# Altium PCB board_orig.PcbDoc
Units mm, origin at the board's own origin, x right, y up, seen from the top; angles counter-clockwise.
Board outline 22 x 15 mm, 2 copper layers (Top Layer, Bottom Layer), stack 0.97 mm thick; 27 components, 19 nets, 66 pads, 0 vias.
Unrouted connection lines stored in the file: 1.
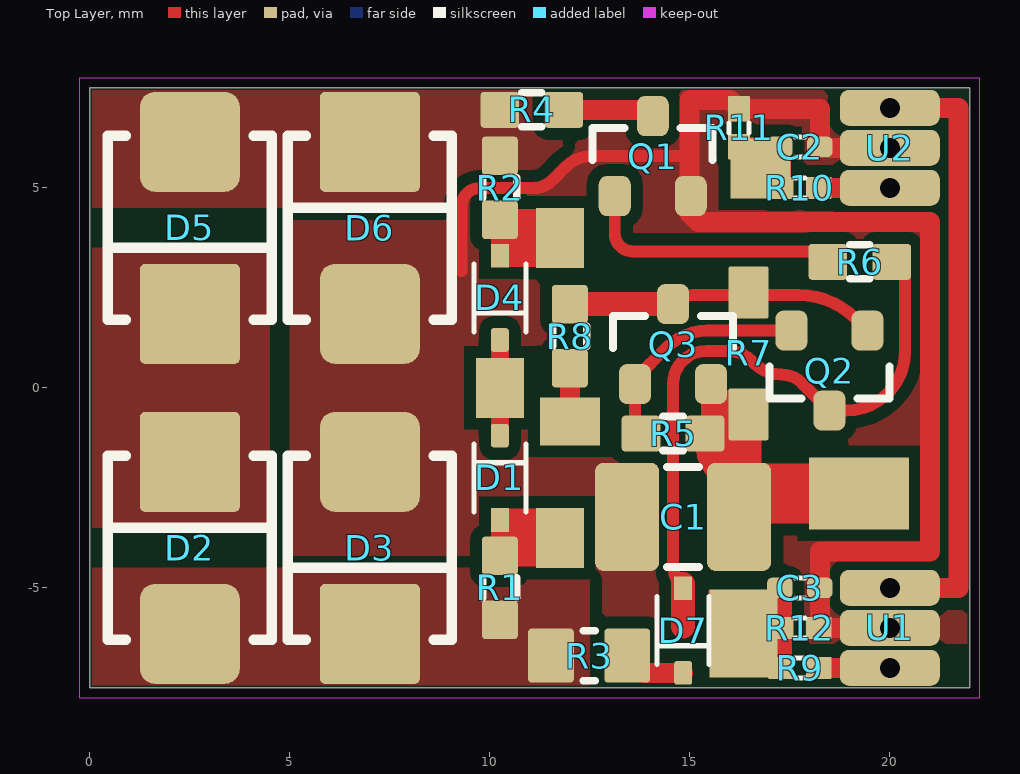
[diagram p0: Top Layer view]
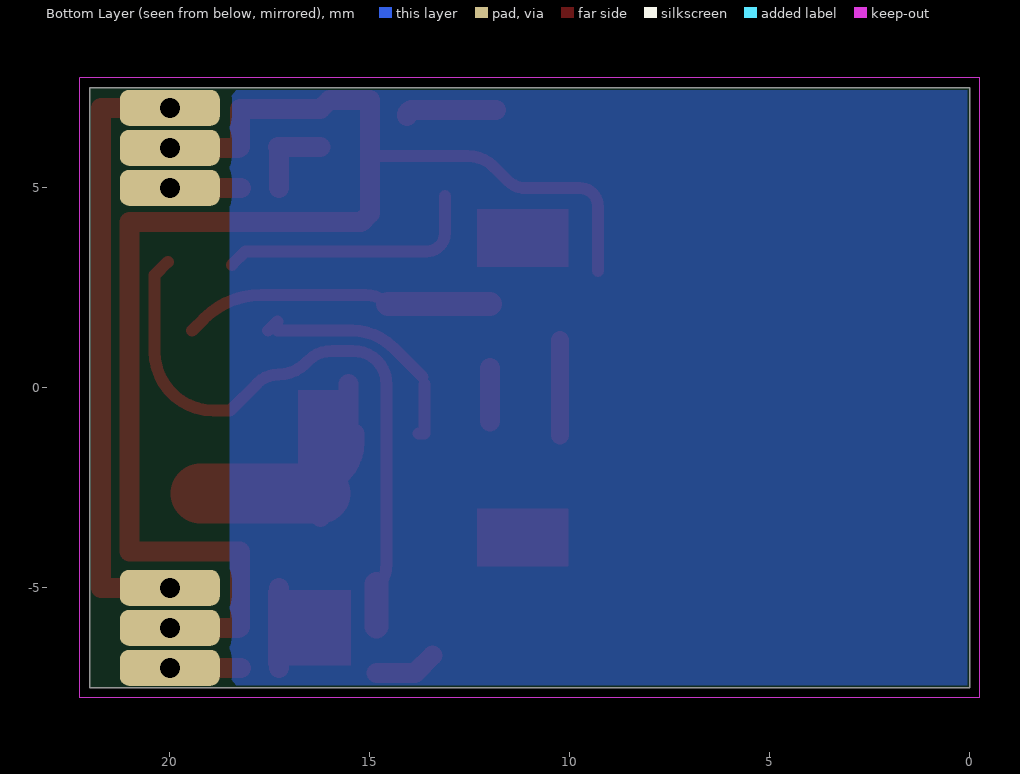
[diagram p1: Bottom Layer view, seen from below]
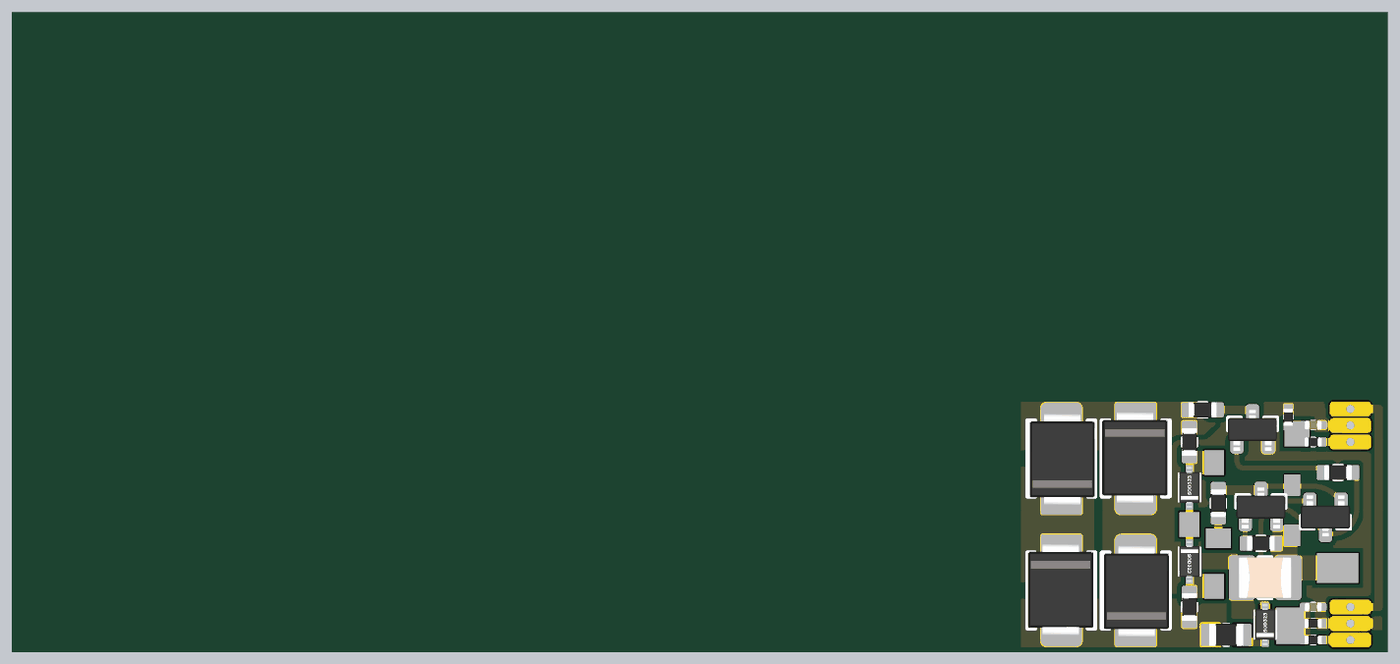
[diagram p2: 3D render of the assembled board from above, using the file's embedded part models]

## Layer stack, top to bottom
Top Solder: solder mask 0.0127, Solder Resist, Dk 3.8
Top Layer: signal copper 0.035
Dielectric: core 0.9, FR-4, Dk 4.5
Bottom Layer: signal copper 0.035
Bottom Solder: solder mask 0.0127, Solder Resist, Dk 3.8

## Board outline
0,-7.5 22,-7.5 22,7.5 0,7.5

## Design rules (kind name [scope] priority, off if disabled: settings)
AcuteAngle [All] p1: minimum=6.00000000000000E+0001 checktracksonly=FALSE
BoardOutlineClearance [All] p1: gap=0 ignorepadtopadclearanceinfootprint=FALSE
Clearance Clearance_1 [All] p1: gap=0.3 ignorepadtopadclearanceinfootprint=FALSE except(0.1: Arc-THPad Track-THPad SMDPad-THPad THPad-THPad; 0.13: Arc-Arc Arc-Track Arc-SMDPad Arc-Via Track-Track Track-SMDPad Track-Via SMDPad-SMDPad SMDPad-Via THPad-Via Via-Via; 0.15: Arc-Text Arc-Hole Track-Text Track-Hole SMDPad-Text SMDPad-Hole THPad-Text THPad-Hole Via-Text Via-Hole Fill-Text Fill-Hole Poly-Text Poly-Hole Region-Text Region-Hole Text-Text Text-Hole)
ComponentClearance ComponentClearance_1 [IsFree] p1: gap=-1 collisioncheckmode=3 verticalgap=2540 showdistances=FALSE
ComponentClearance [All] p2: gap=0.3 collisioncheckmode=3 verticalgap=0.254 showdistances=FALSE donotcheckwithout3dbody=TRUE
Height [All] p1: minheight=0 maxheight=500 prefheight=12.7
HoleSize [All] p1: absolutevalues=TRUE maxlimit=6 minlimit=0.2 maxpercent=80.000 minpercent=20.000
HoleToHoleClearance HoleToHoleClearance_1 [IsVia vs IsThruPin] p1: gap=0.7 allowstackedmicrovias=TRUE
HoleToHoleClearance [All] p2: gap=0.5 allowstackedmicrovias=TRUE
MinimumSolderMaskSliver [All] p1 off: minsoldermaskwidth=0.254
PlaneClearance [All] p1: clearance=0.45
PlaneConnect [All] p1: planeconnectstyle=Direct reliefexpansion=0.3 reliefentries=4 reliefconductorwidth=0.381 reliefairgap=0.178
PolygonConnect [All] p1: connectstyle=Direct reliefconductorwidth=0.381 reliefentries=4 polygonreliefangle="90 Angle" airgapwidth=0.356
RoutingVias [All] p1: holewidth=0.3 width=0.6 viastyle="Through Hole" minholewidth=0.2 minwidth=0.45 maxholewidth=0.9 maxwidth=1.27
SilkToSilkClearance [All] p1 off: silktosilkclearance=0.254
SilkToSolderMaskClearance [IsPad] p1 off: minsilkscreentomaskgap=0.254 clearancetoexposedcopper=TRUE
SolderMaskExpansion [All] p1: expansion=0.102 istentingtop=FALSE
SupplyNets "Schematic Supply Nets_7" [InNet('L1')] p1: voltage=0.000
SupplyNets "Schematic Supply Nets_6" [InNet('L2')] p2: voltage=0.000
SupplyNets "Schematic Supply Nets_5" [InNet('3V3')] p3: voltage=0.000
SupplyNets "Schematic Supply Nets_3" [InNet('Vb')] p4: voltage=0.000
SupplyNets "Schematic Supply Nets" [InNet('5V')] p5: voltage=0.000
SupplyNets "Schematic Supply Nets_1" [InNet('GND')] p6: voltage=0.000
UnRoutedNet [All] p1: checkbadconnections=TRUE
Width [All] p1: maxlimit=3.81 minlimit=0.14 preferedwidth=0.254
20 further rules are at their usual default settings.

## Components (designator, comment, footprint, x,y, rotation, side; value= is the part's Value field where it differs from the comment)
C1 "10u" C1210-2.5MM 14.834,-3.226 r180 top
C2 "100pF" C0402 17.75,6.024 r0 top
C3 "100pF" C0402 17.75,-5 r0 top
D1 "1N4148WS" SOD-323 10.25,-2.25 r270 top
D2 "ES2B" SMB 2.5,-4 r90 top
D3 "ES2B" SMB 7,-4 r270 top
D4 "1N4148WS" SOD-323 10.25,2.25 r90 top
D5 "ES2B" SMB 2.5,4 r270 top
D6 "ES2B" SMB 7,4 r90 top
D7 "BAS321" SOD-323 14.834,-6.071 r90 top
Q1 "MMBT2222" SOT-23 14.073,5.793 r270 top
Q2 "Bipolar PNP 3 Pins Transistor Gummel-Poon Model" SOT-23 18.491,0.432 r90 top
Q3 "Bipolar PNP 3 Pins Transistor Gummel-Poon Model" SOT-23 14.58,1.092 r270 top
R1 "20k" R0603 10.25,-5 r270 top
R2 "20k" R0603 10.25,5 r90 top
R3 "22" R0805 12.481,-6.694 r0 top
R4 "1" R0603 11.05,6.95 r0 top
R5 "33" R0603 14.58,-1.143 r180 top
R6 "4k7" R0603 19.25,3.15 r180 top
R7 "10k" R1206 16.468,0.86 r270 top
R8 "4k7" R0603 12,1.292 r270 top
R9 "1k" R0402 17.75,-7 r180 top
R10 "1k" R0402 17.75,5 r180 top
R11 "2k" R0402 16.23,6.5 r270 top
R12 "2k" R0402 17.75,-6 r180 top
U1 "SS49E" SS49E 20,-6 r0 top
U2 "SS49E" SS49E 20,6 r0 top

## Footprints (in the part's own frame and the unit in brackets; to place one, negate y for a bottom-side part, rotate by r counter-clockwise, add the part's x,y. Pads: shape width x height; smd on the part's side, far side on the other; paste and mask are expansions set on the pad)
C0402 [mm] "Chip Capacitor Body"
  rrect50% 0.635x0.508 smd mask+0.05: 1(-0.5,0) 2(0.5,0)
  silkscreen extent -0.13,-0.25 0.13,0.25, body extent -0.52,-0.27 0.53,0.28, height 0.55
C1210-2.5MM [mm] "Chip Capacitor"
  rrect25% 1.6x2.7 smd mask+0.05: 1(-1.4,0) 2(1.4,0)
  silkscreen extent -0.4,-1.25 0.4,1.25, body extent -1.6,-1.25 1.6,1.25, height 2.52
R0402 [mm]
  rrect10% 0.635x0.55 smd mask+0.05: 1(-0.476,0) 2(0.476,0)
  silkscreen extent -0.12,-0.25 0.13,0.25, body extent -0.52,-0.27 0.53,0.28, height 0.4
R0603 [mil] "Chip Resistor; Body 1.6 x 0.8 mm (LxW typ)"
  rrect20% 38x35.43 smd mask+1.97: 1(-31.5,0) 2(31.5,0)
  silkscreen extent -10,-17 10,17, body extent -33,-18 33,18, height 22
R0805 [mil] "Chip Resistor; Body 1.6 x 0.8 mm (LxW typ)"
  rrect15% 45x53.15 smd: 1(-37.5,0) 2(37.5,0)
  silkscreen extent -6,-25 6,25, body extent -41,-27 41,27, height 24
R1206 [mm] "Chip Resistor"
  rrect10% 1.3x1 smd mask+0.05: 1(-1.524,0) 2(1.524,0)
SMB [mm]
  rrect30% 2.5x2.5 smd mask+0.05: 1(-2.15,0)
  rrect10% 2.5x2.5 smd mask+0.05: 2(2.15,0)
  silkscreen extent -2.3,-2.05 2.3,2.05, body extent -2.75,-1.93 2.85,2.02, height 2.65
SOD-323 [mm]
  rect 0.59x0.45 smd mask+0.05: 1(1.055,0)
  rrect30% 0.59x0.45 smd mask+0.05: 2(-1.055,0)
  silkscreen extent -0.85,-0.65 0.85,0.65, body extent -1.25,-0.63 1.25,0.62, height 0.99
SOT-23 [mm]
  rrect50% 1x0.8 smd mask+0.05: 1(1,-0.95) 2(1,0.95) 3(-1,0)
  silkscreen extent -0.7,-1.5 0.1,1.5, body extent -1.27,-1.5 1.33,1.5, height 1.1
SS49E [mm]
  rrect50% 2.5x0.9 hole 0.5: 1(0,1) 2(0,0) 3(0,-1)

## Part data
C1 C2 C3: library part CAP
D1 D2 D3 D4 D5 D6 D7: library part NCP51460SN33T1G
Q1: library part MMBT2222ALT1G
Q2 Q3: library part "BJT PNP GP"
R1 R2 R3 R4 R5 R6 R7 R8 R9 R10 R11 R12: library part RES

## Free pads (board coordinates)
  rect 1.2x1.5 smd: 3.3(10.25,0) DCC1(11.75,-3.75) DCC2(11.75,3.75)
  rect 2.5x1.8 smd: 5(19.231,-2.642)
  rect 1.5x1.2 smd: +(12,-0.838)
  rect 1.7x2.2 smd: H1(16.341,-6.142)
  rect 1.5x1.5 smd: H2(16.764,5.489)

## Nets (pads, with @x,y where several pads share a name; then routed paths per layer and width w, separated by ;. In a path a pad name is that pad's centre, name@x,y a point inside that pad or via, vN(x,y) a via of type N, cw(c..) or ccw(c..) an arc to the next point about the centre after c; other vN are vias at no path point)
3V3: D1.2 D4.2 pad.3.3 | length 2.4
  Top Layer w0.45: D1.2 pad.3.3 D4.2
5V: C1.1 pad.5 Q3.2 R5.1 R7.2 U1.1 U2.1 | length 22.2
  Top Layer w0.5: Q3.2 15.53,-0.774 15.53,-1.143 R5.1 15.38,-1.359 ccw(c16.483,-1.359) 15.703,-2.139 C1.1@16.234,-2.67 ; C1.1 C1.1@16.234,-2.642 ; U1.1 21.717,-5 21.717,7 U2.1
  Top Layer w1.5: C1.1@16.234,-2.642 pad.5
DCC1: D1.1 pad.DCC1 R1.1
DCC2: D4.1 pad.DCC2 R2.1
GND: C1.2 C2.2 C3.2 D3.1 D6.1 Q1.2 R11.1 R12.1 U1.2 U2.2 | length 37.4
  Top Layer w0.3: 9.296,2.921 9.296,4.547 cw(c9.74,4.547) 9.74,4.99 11.078,4.99 ccw(c11.078,5.684) 11.569,5.193 11.902,5.527 cw(c12.546,4.882) 12.546,5.793 15.037,5.793
  Top Layer w0.5: R12.1@18.25,-5.976 C3.2 18.25,-4.089 21.006,-4.089 21.006,4.14 15.215,4.14 14.996,4.359 14.996,4.793 14.996,5.793 14.996,7.196 16.01,7.196 R11.1 18.25,6.976 C2.2 ; R12.1@18.283,-6 U1.2 ; C2.2@18.283,6 U2.2
HALL1: C3.1 pad.H1 R9.2 R12.2 | length 2
  Top Layer w0.5: R9.2 R12.2 C3.1@17.274,-5
HALL2: C2.1 pad.H2 R10.2 R11.2 | length 2.1
  Top Layer w0.5: R11.2 pad.H2@17.298,6.024 ; R10.2 pad.H2@17.274,6
L1: D2.1 D3.2 R1.2 R3.1
L2: D5.1 D6.2 R2.2 R4.1
NetD7_1: D7.1 Q2.3 R6.1 | length 16.2
  Top Layer w0.3: D7.1 cw(c15.447,-4.402) 14.58,-4.402 14.58,0.087 cw(c15.415,0.087) 15.415,0.922 15.948,0.922 cw(c15.948,0.07) 16.55,0.672 16.609,0.614 ccw(c17.286,1.29) 17.286,0.333 cw(c17.286,-0.4) 17.805,0.118 Q2.3 18.908,-0.568 ccw(c18.908,0.904) 20.38,0.904 20.38,2.819 R6.1
  Top Layer w0.6: 14.834,-5.969 D7.1@14.834,-4.9
NetD7_2: D7.2 R3.2 | length 1.6
  Top Layer w0.5: R3.2 13.865,-7.126 D7.2
NetQ1_1: Q1.1 R6.2 | length 6.7
  Top Layer w0.3: Q1.1 13.123,3.857 ccw(c13.566,3.857) 13.566,3.414 18.109,3.414 R6.2@18.45,3.073
NetQ1_3: Q1.3 R4.2 | length 2.3
  Top Layer w0.5: R4.2 13.917,6.95 cw(c13.917,6.793) Q1.3
NetQ2_1: Q2.1 Q3.3 R7.1 R8.1 | length 7.8
  Top Layer w0.3: Q3.3@14.545,2.092 cw(c15.097,1.54) 15.097,2.321 17.717,2.321 cw(c17.717,0.305) 19.143,1.73 Q2.1
  Top Layer w0.6: R8.1 Q3.3@14.545,2.092
NetQ2_2: Q2.2 Q3.1 R5.2 | length 5.8
  Top Layer w0.3: Q3.1 13.63,-1.143 R5.2 ; Q3.1@13.68,0.27 14.409,0.999 cw(c15.454,-0.046) 15.454,1.432 ; 15.438,1.432 Q2.2@17.313,1.432 ; Q2.2@17.313,1.66 Q2.2
NetR9_1: R9.1 U1.3 | length 1.8
  Top Layer w0.5: R9.1 U1.3
NetR10_1: R10.1 U2.3 | length 1.8
  Top Layer w0.5: R10.1 U2.3
UART_OD: pad.+ R8.2 | length 1.3
  Top Layer w0.5: pad.+ R8.2
Vb: D2.2 D5.2

## Polygon pours and split planes (outlines as drawn)
GND on Top Layer "GND_L01_P003" (solid, remove dead copper, pour order 3): 5,7.5 5,-6.401 22,-6.401 22,7.5
L2 on Top Layer "L2_L01_P002" (solid, remove dead copper, pour order 2): 10.308,4.5 ccw(c10.308,6.915) 12.015,5.207 12.114,5.306 cw(c13.451,3.969) 13.451,5.86 14.02,5.86 ccw(c14.02,6.513) 14.673,6.513 14.673,7.5 0,7.5 0,4.5
L1 on Top Layer "L1_L01_P001" (solid, remove dead copper, pour order 1): 0,-4.5 12.5,-4.5 12.5,-7.5 0,-7.5
Vb on Top Layer "VB_L01_P000" (solid, remove dead copper, pour order 0): 0,3.5 4.5,3.5 4.5,-3.5 0,-3.5
no net on Bottom Layer "NONET_L02_P004" (solid, pour order 4): 0,7.5 0,-7.5 18.5,-7.5 18.5,7.5

## Keep-outs
Keep-Out Layer:
  lines w0: -61,30.5 cw(c-60.5,30.5) -60.5,31
  lines w0.01: -0.25,7.75 -0.25,-7.75 22.25,-7.75 22.25,7.75 ; -0.25,7.753 22.25,7.753

## Other copper
Top Layer:
  rectangle net 5V: 15.53,-2.02 16.789,-0.051
  rectangle net DCC2: 10.033,3.023 12.319,4.47
  rectangle net DCC1: 10.033,-4.47 12.319,-3.023
  rectangle net HALL1: 15.469,-6.947 17.55,-5.053

## Silkscreen, mask and mechanical layers (free items; w line width, h text height)
Top Solder:
  rectangle: 14.396,-6.299 15.268,-4.781
Board Shape:
  lines w0: -61,30.5 cw(c-60.5,30.5) -60.5,31
  lines w0.01: -0.25,-7.75 22.25,-7.75 22.25,7.75 -0.25,7.75 -0.25,-7.75